# Altium PCB 24V-7A-Power-Board-v2.0.PcbDoc (part 4 of 5)
Units mil, origin at the board's own origin, x right, y up, seen from the top; angles counter-clockwise.
Board outline 4921.26 x 6102.36 mil, 2 copper layers (Top Layer, Bottom Layer); 158 components, 79 nets, 394 pads, 81 vias.
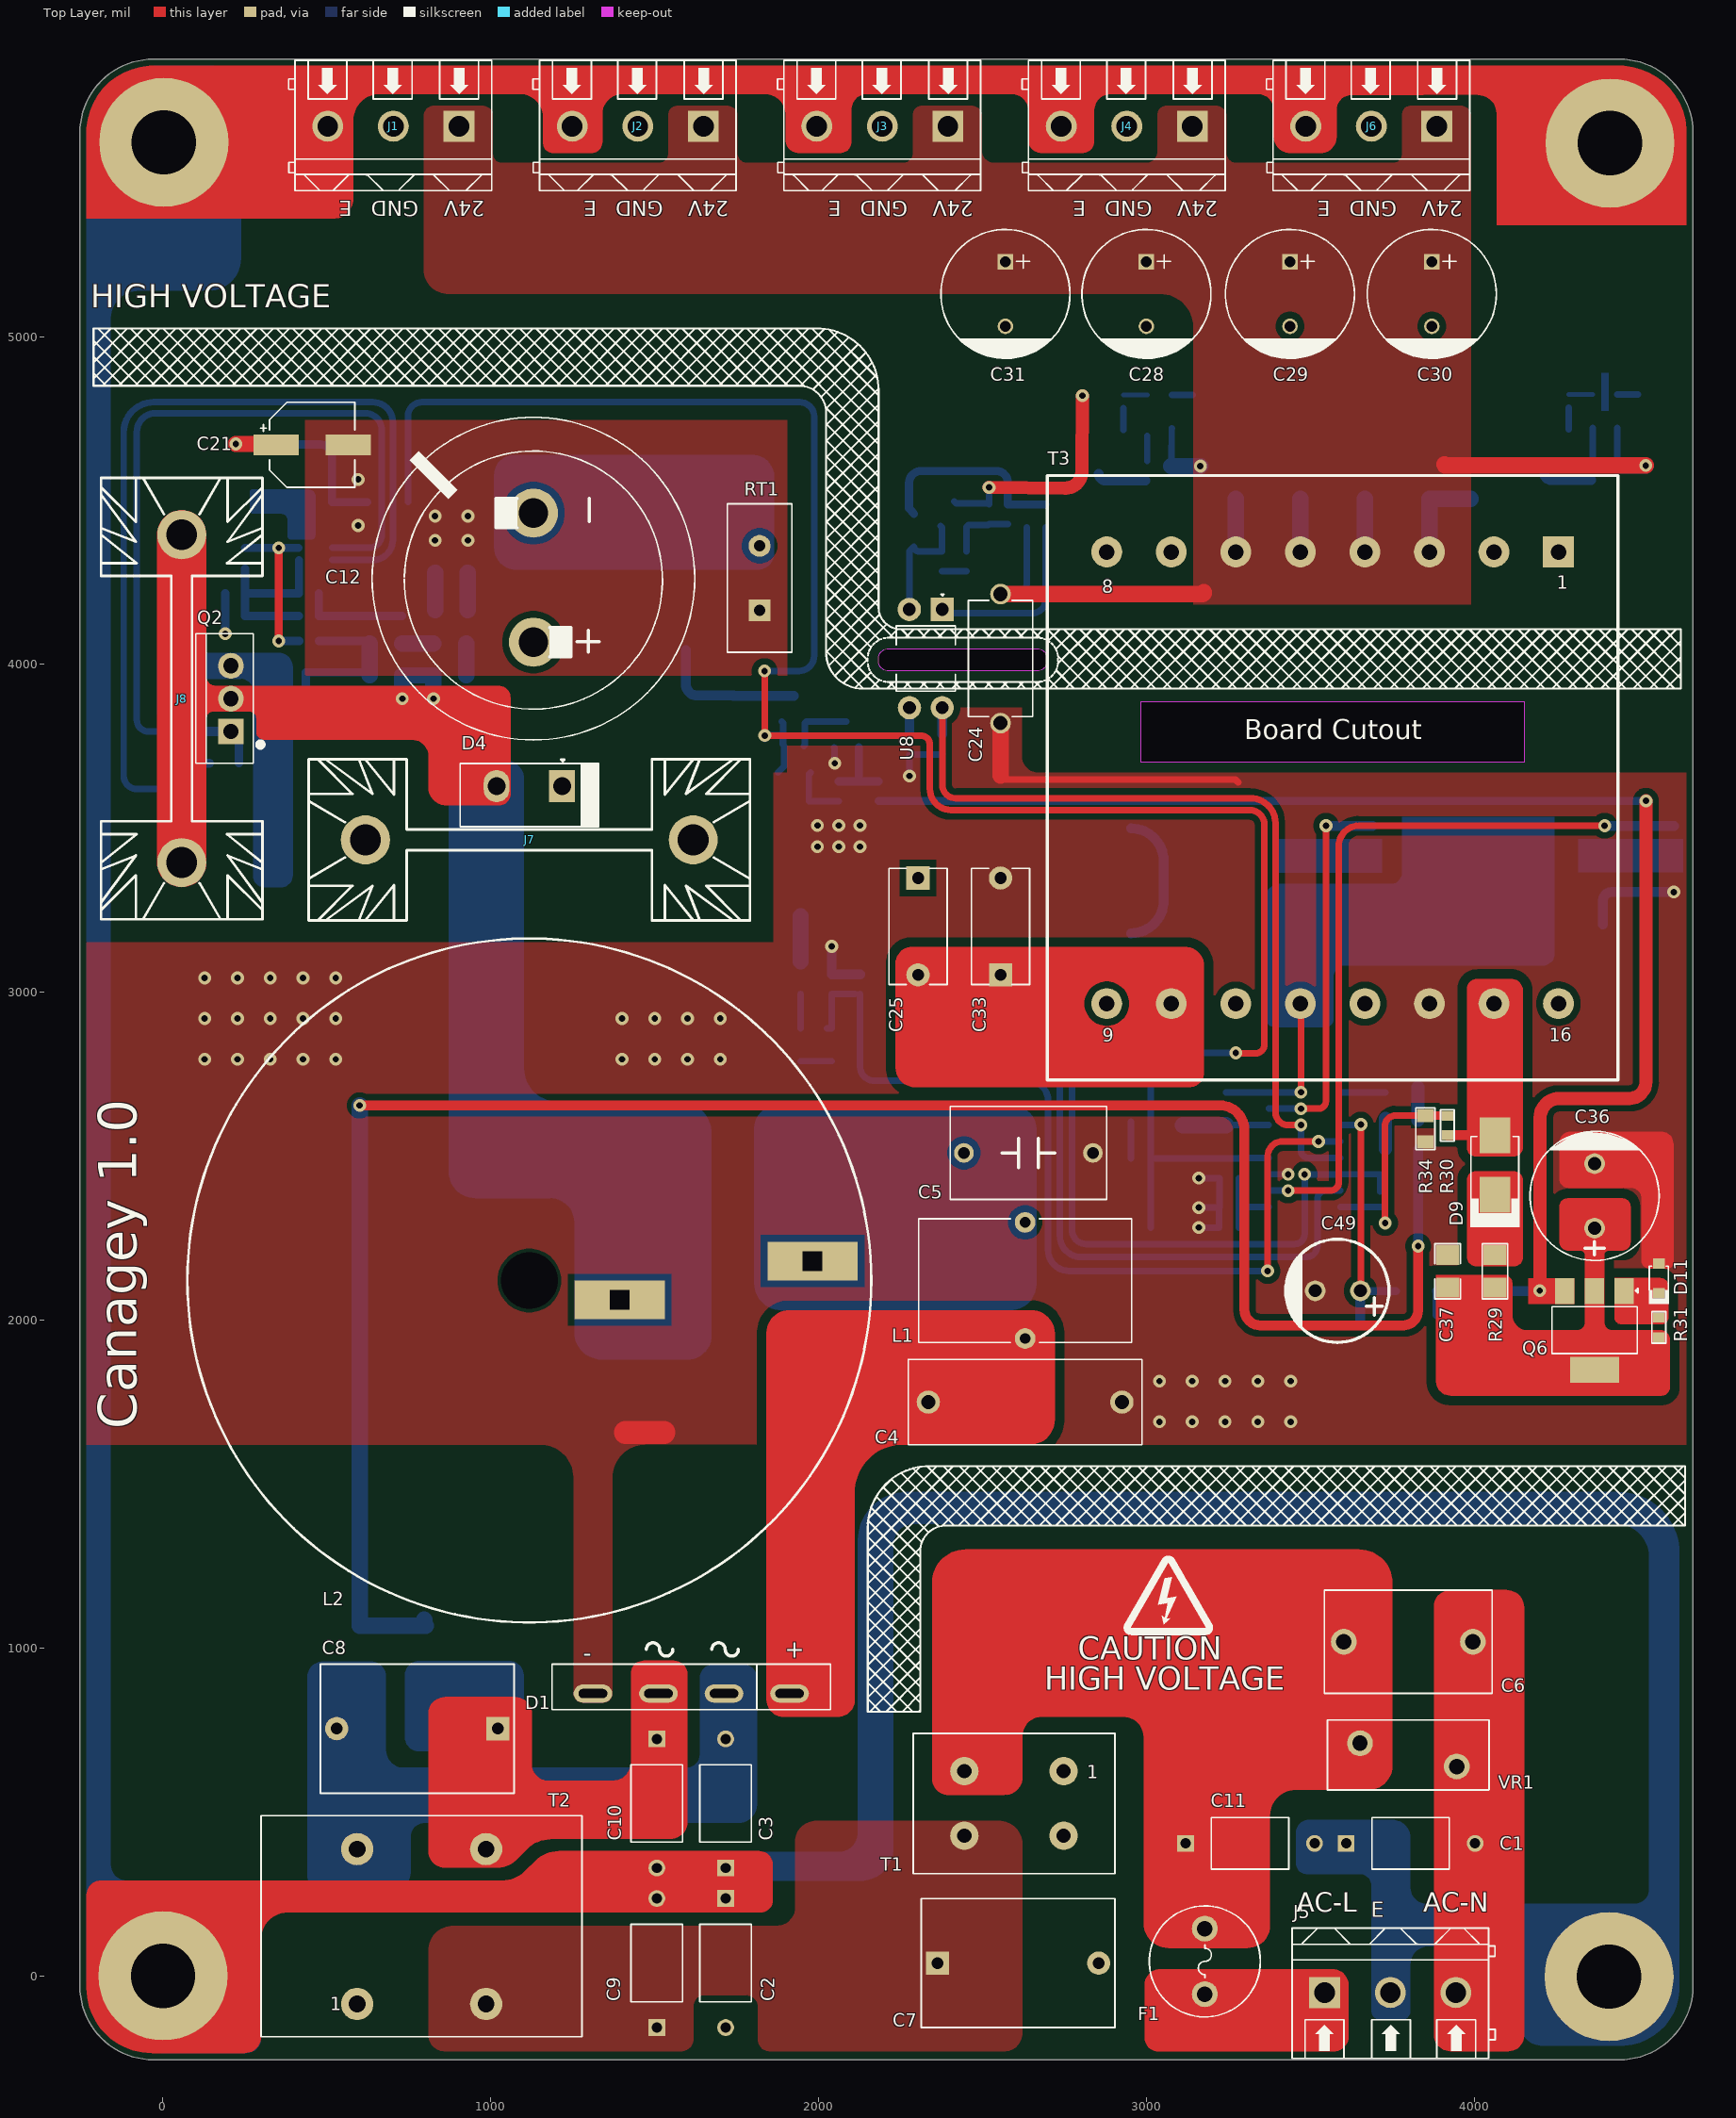
[diagram p0: Top Layer view]

## Part data (continued)
R49: library part CRCW060337K4FKEA, "RES SMD 37.4K OHM 1% 1/10W 0603", LCSC Part Number=C844359, Manufacturer=Vishay, ComponentLink1Description=https://datasheet.ciiva.com/5541/dcrcwe3-109170-5541061.pdf?src-supplier=Mouser, ComponentLink1URL=https://datasheet.ciiva.com/5541/dcrcwe3-109170-5541061.pdf?src-supplier=Mouser, ComponentLink2Description=https://datasheet.ciiva.com/22705/1697337-22705851.pdf?src-supplier=Element14, ComponentLink2URL=https://datasheet.ciiva.com/22705/1697337-22705851.pdf?src-supplier=Element14, ComponentLink3Description=https://datasheet.ciiva.com/16770/70201119-16770680.pdf?src-supplier=Allied+Electronics, ComponentLink3URL=https://datasheet.ciiva.com/16770/70201119-16770680.pdf?src-supplier=Allied+Electronics, ComponentLink4Description=https://datasheet.ciiva.com/7671/1697337-7671645.pdf?src-supplier=Element14, ComponentLink4URL=https://datasheet.ciiva.com/7671/1697337-7671645.pdf?src-supplier=Element14, ComponentLink5Description=https://datasheet.ciiva.com/7671/1697337-7671646.pdf?src-supplier=Element14, ComponentLink5URL=https://datasheet.ciiva.com/7671/1697337-7671646.pdf?src-supplier=Element14, ComponentLink6Description=https://datasheet.ciiva.com/3257/dcrcwe3-3257503.pdf?src-supplier=Avnet, ComponentLink6URL=https://datasheet.ciiva.com/3257/dcrcwe3-3257503.pdf?src-supplier=Avnet, ComponentLink7Description=https://datasheet.ciiva.com/7792/125364-7792237.pdf?src-supplier=Element14, ComponentLink7URL=https://datasheet.ciiva.com/7792/125364-7792237.pdf?src-supplier=Element14, ComponentLink8Description=https://datasheet.ciiva.com/16203/dcrcwe3-16203015.pdf?src-supplier=Future+Electronics, ComponentLink8URL=https://datasheet.ciiva.com/16203/dcrcwe3-16203015.pdf?src-supplier=Future+Electronics, ComponentLink9Description=https://datasheet.ciiva.com/2465/dcrcwe3-2465762.pdf?src-supplier=Digikey, ComponentLink9URL=https://datasheet.ciiva.com/2465/dcrcwe3-2465762.pdf?src-supplier=Digikey, ComponentLink10Description=https://datasheet.ciiva.com/2465/dcrcwe3-2465763.pdf?src-supplier=Digikey, ComponentLink10URL=https://datasheet.ciiva.com/2465/dcrcwe3-2465763.pdf?src-supplier=Digikey, ComponentLink11Description=https://datasheet.ciiva.com/2465/dcrcwe3-2465764.pdf?src-supplier=Digikey, ComponentLink11URL=https://datasheet.ciiva.com/2465/dcrcwe3-2465764.pdf?src-supplier=Digikey, ComponentLink12Description=https://datasheet.ciiva.com/8337/dcrcwe3-8337085.pdf?src-supplier=Avnet, ComponentLink12URL=https://datasheet.ciiva.com/8337/dcrcwe3-8337085.pdf?src-supplier=Avnet, Item Type=Resistor, Manufacturer Part Number=CRCW060337K4FKEA, Pricing="1=0.1, 10=0.026, 50=0.0166, 100=0.014, 500=0.00954, 1000=0.00824 (USD)", RoHS=Yes, Stock=9664, Supplier=Digikey
R50: library part CRCW060344K2FKEA, "RES SMD 44.2K OHM 1% 1/10W 0603", LCSC Part Number=C844365, Manufacturer=Vishay, Voltage Rating (DC)=75V, ComponentLink1Description=https://datasheet.ciiva.com/11812/0900766b80d98afc-11812612.pdf?src-supplier=Rs, ComponentLink1URL=https://datasheet.ciiva.com/11812/0900766b80d98afc-11812612.pdf?src-supplier=Rs, ComponentLink2Description=https://datasheet.ciiva.com/2466/dcrcwe3-2466281.pdf?src-supplier=Digikey, ComponentLink2URL=https://datasheet.ciiva.com/2466/dcrcwe3-2466281.pdf?src-supplier=Digikey, ComponentLink3Description=https://datasheet.ciiva.com/2466/dcrcwe3-2466282.pdf?src-supplier=Digikey, ComponentLink3URL=https://datasheet.ciiva.com/2466/dcrcwe3-2466282.pdf?src-supplier=Digikey, ComponentLink4Description=https://datasheet.ciiva.com/2466/dcrcwe3-2466283.pdf?src-supplier=Digikey, ComponentLink4URL=https://datasheet.ciiva.com/2466/dcrcwe3-2466283.pdf?src-supplier=Digikey, ComponentLink5Description=https://datasheet.ciiva.com/15159/getdatasheetpartid-52050-15159597.pdf?src-supplier=Verical, ComponentLink5URL=https://datasheet.ciiva.com/15159/getdatasheetpartid-52050-15159597.pdf?src-supplier=Verical, ComponentLink6Description=https://datasheet.ciiva.com/16507/dcrcwe3-16507773.pdf?src-supplier=Future+Electronics, ComponentLink6URL=https://datasheet.ciiva.com/16507/dcrcwe3-16507773.pdf?src-supplier=Future+Electronics, ComponentLink7Description=https://datasheet.ciiva.com/22705/1697337-22705852.pdf?src-supplier=Element14, ComponentLink7URL=https://datasheet.ciiva.com/22705/1697337-22705852.pdf?src-supplier=Element14, ComponentLink8Description=https://datasheet.ciiva.com/7671/1697337-7671657.pdf?src-supplier=Element14, ComponentLink8URL=https://datasheet.ciiva.com/7671/1697337-7671657.pdf?src-supplier=Element14, ComponentLink9Description=https://datasheet.ciiva.com/7671/1697337-7671658.pdf?src-supplier=Element14, ComponentLink9URL=https://datasheet.ciiva.com/7671/1697337-7671658.pdf?src-supplier=Element14, ComponentLink10Description=https://datasheet.ciiva.com/16772/70201119-16772373.pdf?src-supplier=Allied+Electronics, ComponentLink10URL=https://datasheet.ciiva.com/16772/70201119-16772373.pdf?src-supplier=Allied+Electronics, ComponentLink11Description=https://datasheet.ciiva.com/22872/70201119-22872024.pdf?src-supplier=Allied+Electronics, ComponentLink11URL=https://datasheet.ciiva.com/22872/70201119-22872024.pdf?src-supplier=Allied+Electronics, Item Type=Resistor, Lead Free=5697LeadFree, Manufacturer Part Number=CRCW060344K2FKEA, Pricing="1=0.1, 10=0.026, 50=0.0166, 100=0.014, 500=0.00954, 1000=0.00824 (USD)", RoHS=Yes, Stock=24979, Supplier=Digikey
R51: library part RC0603JR-070RL, "RES 0 OHM JUMPER 1/10W 0603", Case Code (Imperial)=0603, Case Code (Metric)=1608, LCSC Part Number=C95177, Manufacturer=Yageo, Max Operating Temperature=155°C, Max Power Dissipation=100mW, Min Operating Temperature=-55°C, Package Quantity=5000, Resistance=0mR, Resistance Tolerance=5%, Resistor Type="Thick Film", Supplier Part Number 1=311-0.0GRCT-ND, Temperature Coefficient=200ppm/°C, Tolerance=1%, Voltage Rating=50V, Case/Package=0603, Category="Chip SMD Resistors", Construction=Rectangular, Contact Plating=Tin,Matte, Depth=0.8mm, Features="Moisture Resistant", Height=0.45mm, Item Type=Resistor, Lead Free="Lead Free", Length=1.6mm, Manufacturer Part Number=RC0603JR-070RL, Military Standard=Not, Number of Pins=2, Number of Terminations=2, Packaging="Tape and Reel", Power Rating=100mW, Pricing 1="1=0.10000, 10=0.01700, 25=0.01240, 50=0.00960, 100=0.00700, 250=0.00536, 500=0.00430, 1000=0.00316 (USD)", Radiation Hardening=No, Reach SVHC Compliant="No SVHC", RoHS=Yes, RoHS Compliant=Yes, Series=RC, Size Code=0603, Stock 1=18081776, Supplier 1=Digi-Key, Technology="THICK FILM", Termination=SMD/SMT, Voltage Rating (DC)=50V, Width=0.8mm
R52 R53: library part AC0603FR-07324KL, "RES SMD 324K OHM 1% 1/10W 0603", Case Code (Imperial)=0603, Case Code (Metric)=1608, LCSC Part Number=C227818, Manufacturer=Yageo, Max Operating Temperature=155°C, Max Power Dissipation=100mW, Min Operating Temperature=-55°C, Package Quantity=1, Temperature Coefficient=100ppm/°C, Tolerance=1%, Voltage Rating=50V, Case/Package=0603, ComponentLink1Description=http://www.mouser.com/ds/2/447/yageodocoutput-1111992.pdf?src-supplier=Mouser, ComponentLink1URL=http://www.mouser.com/ds/2/447/yageodocoutput-1111992.pdf?src-supplier=Mouser, ComponentLink2Description=https://www.yageo.com/upload/media/product/productsearch/datasheet/rchip/PYu-AC_51_RoHS_L_7.pdf?src-supplier=Digikey, ComponentLink2URL=https://www.yageo.com/upload/media/product/productsearch/datasheet/rchip/PYu-AC_51_RoHS_L_7.pdf?src-supplier=Digikey, Features="Moisture Resistant,Automotive AEC-Q200,Anti-Sulfur", Height=0.022inch, Item Type=Resistors, Length=0.063inch, Manufacturer Part Number=AC0603FR-07324KL, Number of Terminations=2, Packaging="Tape and Reel", Power Rating=100mW, Pricing="1=0.1, 10=0.021, 50=0.013, 100=0.0108, 500=0.00734, 1000=0.00633 (USD)", RoHS=Yes, RoHS Compliant=Yes, Series=AC, Stock=5000, Supplier=Digikey, Termination=SMD/SMT, Width=0.031inch
R54: library part CRCW060320R0FKEA, "RES SMD 20 OHM 1% 1/10W 0603", Case Code (Imperial)=0603, Case Code (Metric)=1608, LCSC Part Number=C844755, Manufacturer=Vishay, Max Operating Temperature=155°C, Max Power Dissipation=100mW, Min Operating Temperature=-55°C, Package Quantity=10, Ratings=AEC-Q200, Resistance Tolerance=1%, Resistor Type="Thick Film", Temperature Coefficient=100ppm/°C, Voltage Rating=75V, Case/Package=0603, ComponentLink1Description=https://datasheet.ciiva.com/11810/0900766b80d98afc-11810778.pdf?src-supplier=Rs, ComponentLink1URL=https://datasheet.ciiva.com/11810/0900766b80d98afc-11810778.pdf?src-supplier=Rs, ComponentLink2Description=https://datasheet.ciiva.com/7748/1533075-7748858.pdf?src-supplier=Element14, ComponentLink2URL=https://datasheet.ciiva.com/7748/1533075-7748858.pdf?src-supplier=Element14, ComponentLink3Description=https://datasheet.ciiva.com/2465/dcrcwe3-2465673.pdf?src-supplier=Digikey, ComponentLink3URL=https://datasheet.ciiva.com/2465/dcrcwe3-2465673.pdf?src-supplier=Digikey, ComponentLink4Description=https://datasheet.ciiva.com/2465/dcrcwe3-2465674.pdf?src-supplier=Digikey, ComponentLink4URL=https://datasheet.ciiva.com/2465/dcrcwe3-2465674.pdf?src-supplier=Digikey, ComponentLink5Description=https://datasheet.ciiva.com/16776/70201119-16776202.pdf?src-supplier=Allied+Electronics, ComponentLink5URL=https://datasheet.ciiva.com/16776/70201119-16776202.pdf?src-supplier=Allied+Electronics, ComponentLink6Description=https://datasheet.ciiva.com/26316/fld-crcw-e3-data-en-26316589.pdf?src-supplier=Distrelec, ComponentLink6URL=https://datasheet.ciiva.com/26316/fld-crcw-e3-data-en-26316589.pdf?src-supplier=Distrelec, ComponentLink7Description=https://datasheet.ciiva.com/2465/dcrcwe3-2465672.pdf?src-supplier=Digikey, ComponentLink7URL=https://datasheet.ciiva.com/2465/dcrcwe3-2465672.pdf?src-supplier=Digikey, ComponentLink8Description=https://datasheet.ciiva.com/16788/70201119-16788011.pdf?src-supplier=Allied+Electronics, ComponentLink8URL=https://datasheet.ciiva.com/16788/70201119-16788011.pdf?src-supplier=Allied+Electronics, ComponentLink9Description=https://datasheet.ciiva.com/5548/dcrcwe3-109170-5548022.pdf?src-supplier=Mouser, ComponentLink9URL=https://datasheet.ciiva.com/5548/dcrcwe3-109170-5548022.pdf?src-supplier=Mouser, ComponentLink10Description=https://datasheet.ciiva.com/3257/dcrcwe3-3257244.pdf?src-supplier=Avnet, ComponentLink10URL=https://datasheet.ciiva.com/3257/dcrcwe3-3257244.pdf?src-supplier=Avnet, ComponentLink11Description=https://datasheet.ciiva.com/16374/dcrcwe3-16374634.pdf?src-supplier=Future+Electronics, ComponentLink11URL=https://datasheet.ciiva.com/16374/dcrcwe3-16374634.pdf?src-supplier=Future+Electronics, ComponentLink12Description=https://datasheet.ciiva.com/3257/dcrcwe3-3257243.pdf?src-supplier=Avnet, ComponentLink12URL=https://datasheet.ciiva.com/3257/dcrcwe3-3257243.pdf?src-supplier=Avnet, Construction=Rectangular, Contact Plating=Tin, Depth=0.85mm, Features="Automotive AEC-Q200", Height=0.45mm, Item Type=Resistors, Lead Free="Lead Free", Length=1.55mm, Manufacturer Part Number=CRCW060320R0FKEA, Military Standard=Not, Number of Terminations=2, Packaging="Tape and Reel", Power Rating=100mW, Pricing="1=0.1, 10=0.026, 50=0.0166, 100=0.014, 500=0.00954, 1000=0.00824 (USD)", Radiation Hardening=No, Reach SVHC Compliant=Unknown, RoHS=Yes, RoHS Compliant=Yes, Series=CRCW, Stock=100733, Supplier=Digikey, Technology="THICK FILM", Termination=SMD/SMT, Tolerance=1%, Voltage Rating (DC)=75V, Weight=7.1E-05oz, Width=0.033inch
R55: library part RC1206FR-0720KL, "RES 20K OHM 1% 1/4W 1206", LCSC Part Number=C114940, Manufacturer=Yageo, Voltage Rating (DC)=200V, ComponentLink1Description=https://datasheet.ciiva.com/11809/0900766b80c6630a-11809460.pdf?src-supplier=Rs, ComponentLink1URL=https://datasheet.ciiva.com/11809/0900766b80c6630a-11809460.pdf?src-supplier=Rs, ComponentLink2Description=https://datasheet.ciiva.com/16746/pyu-rc1206-51-rohs-l-4-16746334.pdf?src-supplier=Future+Electronics, ComponentLink2URL=https://datasheet.ciiva.com/16746/pyu-rc1206-51-rohs-l-4-16746334.pdf?src-supplier=Future+Electronics, Item Type=Resistors, Lead Free=5697LeadFree, Manufacturer Part Number=RC1206FR-0720KL, Pricing="1=0.1, 10=0.038, 50=0.0244, 100=0.0206, 500=0.01434, 1000=0.01248 (USD)", RoHS=Yes, Stock=286094, Supplier=Digikey
R56: library part CRCW060312K4FKEA, "RES SMD 12.4K OHM 1% 1/10W 0603", Case Code (Imperial)=0603, Case Code (Metric)=1608, Case/Package=345Case, LCSC Part Number=C844524, Manufacturer=Vishay, Max Operating Temperature=155°C, Min Operating Temperature=-55°C, Power Rating=100mW, Resistance Tolerance=1%, Resistor Type="Thick Film", Temperature Coefficient=100ppm/°C, Voltage Rating=75V, ComponentLink1Description=http://www.farnell.com/datasheets/2310790.pdf?src-supplier=Farnell, ComponentLink1URL=http://www.farnell.com/datasheets/2310790.pdf?src-supplier=Farnell, ComponentLink2Description=https://datasheet.octopart.com/CRCW060312K4FKEA-Vishay-datasheet-62317933.pdf?src-supplier=Element14, ComponentLink2URL=https://datasheet.octopart.com/CRCW060312K4FKEA-Vishay-datasheet-62317933.pdf?src-supplier=Element14, ComponentLink3Description=http://www.farnell.com/datasheets/2310790.pdf?src-supplier=Newark, ComponentLink3URL=http://www.farnell.com/datasheets/2310790.pdf?src-supplier=Newark, ComponentLink4Description=https://datasheet.octopart.com/CRCW060312K4FKEA-Vishay-datasheet-5300368.pdf?src-supplier=Future+Electronics, ComponentLink4URL=https://datasheet.octopart.com/CRCW060312K4FKEA-Vishay-datasheet-5300368.pdf?src-supplier=Future+Electronics, ComponentLink5Description=http://www.farnell.com/datasheets/2310790.pdf?src-supplier=Element14, ComponentLink5URL=http://www.farnell.com/datasheets/2310790.pdf?src-supplier=Element14, ComponentLink6Description=https://datasheet.octopart.com/CRCW060312K4FKEA-Vishay-datasheet-83961561.pdf?src-supplier=Newark, ComponentLink6URL=https://datasheet.octopart.com/CRCW060312K4FKEA-Vishay-datasheet-83961561.pdf?src-supplier=Newark, Height=500um, Item Type=Resistors, Lead Free=5697LeadFree, Manufacturer Part Number=CRCW060312K4FKEA, Packaging=13Packaging, Pins=2NUMBER, Pricing="1=0.1, 10=0.026, 50=0.0166, 100=0.014, 500=0.00954, 1000=0.00824 (USD)", RoHS=Yes, RoHS Compliant=Yes, Stock=12301, Supplier=Digikey, Tolerance=1%
RT1: "ICL 10 OHM 20% 3.5A 11.5MM", Current Rating=3.5A, LCSC Part Number=C125458, Manufacturer="TDK EPCOS", Tolerance=20%, ComponentLink1Description=https://datasheet.ciiva.com/15097/getdatasheetpartid-119550-15097692.pdf?src-supplier=Verical, ComponentLink1URL=https://datasheet.ciiva.com/15097/getdatasheetpartid-119550-15097692.pdf?src-supplier=Verical, ComponentLink2Description=https://datasheet.ciiva.com/1321/1851770-1321676.pdf?src-supplier=Element14, ComponentLink2URL=https://datasheet.ciiva.com/1321/1851770-1321676.pdf?src-supplier=Element14, Diameter=11.5mm, Item Type=Thermistors, Lead Free=5697LeadFree, Manufacturer Part Number=B57236S0100M000, Pricing="1=0.84, 10=0.78, 50=0.646, 100=0.572, 1000=0.44, 10000=0.373 (USD)", RoHS=Yes, Stock=2235, Supplier=Mouser, Thickness=6mm
T1: "CMC 1MH 3A 2LN TH", Manufacturer="Wurth Electronics", Supplier Part Number=732-1439-ND, ComponentLink1Description=https://datasheet.ciiva.com/4952/744822301-91864-4952415.pdf?src-supplier=Mouser, ComponentLink1URL=https://datasheet.ciiva.com/4952/744822301-91864-4952415.pdf?src-supplier=Mouser, ComponentLink2Description=https://datasheet.ciiva.com/11796/0900766b804ac271-11796688.pdf?src-supplier=Rs, ComponentLink2URL=https://datasheet.ciiva.com/11796/0900766b804ac271-11796688.pdf?src-supplier=Rs, ComponentLink3Description=https://datasheet.ciiva.com/7211/70388-7211253.pdf?src-supplier=Newark, ComponentLink3URL=https://datasheet.ciiva.com/7211/70388-7211253.pdf?src-supplier=Newark, ComponentLink4Description=https://datasheet.ciiva.com/7754/1736520-7754735.pdf?src-supplier=Element14, ComponentLink4URL=https://datasheet.ciiva.com/7754/1736520-7754735.pdf?src-supplier=Element14, ComponentLink5Description=https://datasheet.ciiva.com/6216/744822301-6216281.pdf?src-supplier=Digikey, ComponentLink5URL=https://datasheet.ciiva.com/6216/744822301-6216281.pdf?src-supplier=Digikey, Item Type=Inductor, Manufacturer Part Number=744822301, Pricing="1=4.57, 10=4.5, 50=3.57, 140=3.41, 280=3.1 (USD)", RoHS=Yes, Stock=1589, Supplier=Digikey
T2: "CMC 10MH 3A 2LN TH", Case/Package=L, Current=3A, DC Resistance (DCR)=105mR, Inductance Tolerance=30%, Manufacturer="Wurth Electronics", Max Operating Temperature=125°C, Min Operating Temperature=-40°C, Package Quantity=200, Supplier Part Number=732-1452-ND, Test Frequency=10kHz, ComponentLink1Description=https://datasheet.ciiva.com/11796/0900766b804acf58-11796710.pdf?src-supplier=Rs, ComponentLink1URL=https://datasheet.ciiva.com/11796/0900766b804acf58-11796710.pdf?src-supplier=Rs, ComponentLink2Description=https://datasheet.ciiva.com/4952/744824310-39306-4952431.pdf?src-supplier=Mouser, ComponentLink2URL=https://datasheet.ciiva.com/4952/744824310-39306-4952431.pdf?src-supplier=Mouser, ComponentLink3Description=https://datasheet.ciiva.com/6214/744824310-6214810.pdf?src-supplier=Digikey, ComponentLink3URL=https://datasheet.ciiva.com/6214/744824310-6214810.pdf?src-supplier=Digikey, ComponentLink4Description=https://datasheet.ciiva.com/7211/70411-7211262.pdf?src-supplier=Newark, ComponentLink4URL=https://datasheet.ciiva.com/7211/70411-7211262.pdf?src-supplier=Newark, ComponentLink5Description=https://datasheet.ciiva.com/7754/1736534-7754741.pdf?src-supplier=Element14, ComponentLink5URL=https://datasheet.ciiva.com/7754/1736534-7754741.pdf?src-supplier=Element14, ComponentLink6Description=https://datasheet.ciiva.com/48690/001088035-da-01-ml-we-cmb-stromkomp-netzdrossel-74482-de-en-48690603.pdf?src-supplier=Conrad, ComponentLink6URL=https://datasheet.ciiva.com/48690/001088035-da-01-ml-we-cmb-stromkomp-netzdrossel-74482-de-en-48690603.pdf?src-supplier=Conrad, Current Rating=3A, Depth=18.5mm, Height=33mm, Item Type="Common Mode Chokes", Lead Free="Lead Free", Lead Pitch=10mm, Length=27.5mm, Manufacturer Part Number=744824310, Max DC Current=3A, Mounting Technology="Through Hole,Radial", Number of Lines=2, Packaging=Bulk, Pins=4, Pricing="1=5.63, 10=5.54, 100=4.39, 250=4.2, 500=3.82 (USD)", Reach SVHC Compliant=No, RoHS=Yes, RoHS Compliant=Yes, Series=WE-CMB, Stock=278, Supplier=Digikey, Termination=Radial, Tolerance=30%, Width=18.5mm
T3: "XFMR RES CONV AC/DC 400UH TH", Current Rating=10.4A, Frequency=120kHz, Manufacturer="Wurth Electronics", Max Operating Temperature=125°C, Min Operating Temperature=-40°C, Output Voltage=24V, Package Quantity=20, Power Rating=250W, Supplier Part Number=732-5069-ND, ComponentLink1Description=https://datasheet.ciiva.com/24142/760895741-270531-24142074.pdf?src-supplier=Mouser, ComponentLink1URL=https://datasheet.ciiva.com/24142/760895741-270531-24142074.pdf?src-supplier=Mouser, ComponentLink2Description=https://datasheet.ciiva.com/29632/760895741-29632482.pdf?src-supplier=Digikey, ComponentLink2URL=https://datasheet.ciiva.com/29632/760895741-29632482.pdf?src-supplier=Digikey, Height=27.5mm, Item Type=Transformer, Length=48mm, Manufacturer Part Number=760895741, Mounting Technology="Through Hole", Output Current=10.4A, Packaging=Tray, Pricing="1=22.74, 10=21.792, 50=20.43, 100=18.3881, 500=15.66304 (USD)", RoHS=Yes, RoHS Compliant=Yes, Series=WE-LLCR, Shielding=Unshielded, Stock=7, Supplier=Digikey, Termination=Solder, Width=35mm
U1: "IC PFC CTRLR TRANSITION SOT23-6", LCSC Part Number=C2868631, Manufacturer="Texas Instruments", Package=SOT-23-6, ComponentLink1Description=LCSC, ComponentLink1URL=https://www.lcsc.com/product-detail/AC-DC-Controllers-Regulators_Texas-Instruments-UCC28056DBVT_C2868631.html, Item Type=IC, Manufacturer Part Number=UCC28056DBVT
U2 U3: "MOSFET N-CH 650V 22.4A D2PAK", Case/Package=TO-263-3, LCSC Part Number=C536639, Manufacturer=Infineon, Halogen Free="Halogen Free", Item Type=Mosfet, Manufacturer Part Number=IPB65R150CFDA, Packaging="Tape and Reel", Pins=3, Pricing="1000=2.73 (USD)", Stock=1000, Supplier="Future Electronics"
U4 U5: "SYNC RECTIFIER FLYBACK", LCSC Part Number=C471044, Manufacturer="Texas Instruments", ComponentLink1Description=http://www.ti.com/general/docs/suppproductinfo.tsp?distId=10&amp;gotoUrl=http%3A%2F%2Fwww.ti.com%2Flit%2Fgpn%2Fucc24612&src-supplier=Digikey, ComponentLink1URL=http://www.ti.com/general/docs/suppproductinfo.tsp?distId=10&amp;gotoUrl=http%3A%2F%2Fwww.ti.com%2Flit%2Fgpn%2Fucc24612&src-supplier=Digikey, Height=1.45mm, Item Type=IC, Length=2.9mm, Manufacturer Part Number=UCC24612-2DBVR, Pins=5NUMBER, Pricing="1=0.92, 10=0.758, 50=0.758, 100=0.575, 1000=0.392, 10000=0.317 (USD)", RoHS=Yes, Stock=6284, Supplier=Mouser, Thickness=1.2mm, Width=1.6mm
U6: "HALF BRIDGE CONT WITH HV DRIVER", LCSC Part Number=C2867939, Manufacturer="Texas Instruments", ComponentLink1Description=http://www.ti.com/general/docs/suppproductinfo.tsp?distId=10&amp;gotoUrl=http%3A%2F%2Fwww.ti.com%2Flit%2Fgpn%2Fucc256402&src-supplier=Digikey, ComponentLink1URL=http://www.ti.com/general/docs/suppproductinfo.tsp?distId=10&amp;gotoUrl=http%3A%2F%2Fwww.ti.com%2Flit%2Fgpn%2Fucc256402&src-supplier=Digikey, Item Type=IC, Manufacturer Part Number=UCC256404DDBR, Pricing="1=2.34, 10=1.99, 50=1.99, 100=1.69, 1000=1.15, 10000=0.981 (USD)", RoHS=Yes, Stock=2756, Supplier=Mouser
U7: "IC VREF SHUNT ADJ 1% SOT23-3", LCSC Part Number=C1852128, Manufacturer="Texas Instruments", ComponentLink1Description=http://www.ti.com/general/docs/suppproductinfo.tsp?distId=10&amp;gotoUrl=http%3A%2F%2Fwww.ti.com%2Flit%2Fgpn%2Fatl431li-q1&src-supplier=Digikey, ComponentLink1URL=http://www.ti.com/general/docs/suppproductinfo.tsp?distId=10&amp;gotoUrl=http%3A%2F%2Fwww.ti.com%2Flit%2Fgpn%2Fatl431li-q1&src-supplier=Digikey, Item Type=IC, Manufacturer Part Number=ATL432LIAQDBZRQ1, Pricing="1=0.61, 10=0.523, 25=0.488, 100=0.3903, 250=0.3624, 500=0.30664, 1000=0.23695 (USD)", RoHS=Yes, Stock=1265, Supplier=Digikey
U8: "Optocoupler DC-IN 1-CH Transistor DC-OUT 4-Pin PDIP", LCSC Part Number=C142630, Manufacturer="Vishay Semiconductors", ComponentLink1Description=https://datasheet.ciiva.com/26941/getdatasheetpartid-641306-26941970.pdf?src-supplier=Verical, ComponentLink1URL=https://datasheet.ciiva.com/26941/getdatasheetpartid-641306-26941970.pdf?src-supplier=Verical, ComponentLink2Description=https://datasheet.ciiva.com/2087/vo618a-2087569.pdf?src-supplier=Digikey, ComponentLink2URL=https://datasheet.ciiva.com/2087/vo618a-2087569.pdf?src-supplier=Digikey, ComponentLink3Description=https://datasheet.ciiva.com/8086/vo618a-8086102.pdf?src-supplier=Avnet, ComponentLink3URL=https://datasheet.ciiva.com/8086/vo618a-8086102.pdf?src-supplier=Avnet, Item Type=Optocouplers, Manufacturer Part Number=VO618A-3, Pricing="1=0.46, 10=0.283, 100=0.1626, 1000=0.12726, 2000=0.11666, 5000=0.10605, 10000=0.09898, 25000=0.09544 (USD)", RoHS=Yes, Stock=6419, Supplier=Digikey
VR1: "VARISTOR 430V 3.5KA DISC 10MM", Case/Package=Radial, Clamping Current=25A, Clamping Voltage=710V, Flammability Rating=5813Flammability, LCSC Part Number=C210564, Manufacturer="TDK EPCOS", Max Operating Temperature=85°C, Max Surge Current=3.5kA, Max Varistor Voltage=473V, Max Voltage Rating (AC)=275V, Max Voltage Rating (DC)=350V, Min Operating Temperature=-40°C, Min Varistor Voltage=387V, Power Rating=400mW, Tolerance=10%, Varistor Voltage=430V, ComponentLink1Description=http://www.farnell.com/datasheets/1680955.pdf?src-supplier=Farnell, ComponentLink1URL=http://www.farnell.com/datasheets/1680955.pdf?src-supplier=Farnell, ComponentLink2Description=http://www.farnell.com/datasheets/2311597.pdf?src-supplier=Farnell, ComponentLink2URL=http://www.farnell.com/datasheets/2311597.pdf?src-supplier=Farnell, ComponentLink3Description=http://components.arrow.com/part/dataview/30869957S9461734N9769?src-supplier=Arrow+Electronics, ComponentLink3URL=http://components.arrow.com/part/dataview/30869957S9461734N9769?src-supplier=Arrow+Electronics, ComponentLink4Description=http://www.farnell.com/datasheets/1680955.pdf?src-supplier=Element14, ComponentLink4URL=http://www.farnell.com/datasheets/1680955.pdf?src-supplier=Element14, ComponentLink5Description=http://www.farnell.com/datasheets/2311597.pdf?src-supplier=Newark, ComponentLink5URL=http://www.farnell.com/datasheets/2311597.pdf?src-supplier=Newark, ComponentLink6Description=http://datasheet.octopart.com/B72210S2271K101-EPCOS-datasheet-11546246.pdf?src-supplier=Distrelec, ComponentLink6URL=http://datasheet.octopart.com/B72210S2271K101-EPCOS-datasheet-11546246.pdf?src-supplier=Distrelec, ComponentLink7Description=https://en.tdk.eu/inf/70/db/var/SIOV_Leaded_AdvanceD.pdf?src-supplier=Digikey, ComponentLink7URL=https://en.tdk.eu/inf/70/db/var/SIOV_Leaded_AdvanceD.pdf?src-supplier=Digikey, ComponentLink8Description=https://datasheet.octopart.com/S10K275E2-EPCOS-datasheet-5104.pdf?src-supplier=Future+Electronics, ComponentLink8URL=https://datasheet.octopart.com/S10K275E2-EPCOS-datasheet-5104.pdf?src-supplier=Future+Electronics, ComponentLink9Description=http://datasheet.octopart.com/B72210S2271K101-EPCOS-datasheet-11546246.pdf?src-supplier=Mouser, ComponentLink9URL=http://datasheet.octopart.com/B72210S2271K101-EPCOS-datasheet-11546246.pdf?src-supplier=Mouser, ComponentLink10Description=https://datasheet.octopart.com/B72210S2271K101-EPCOS-datasheet-11546246.pdf?src-supplier=Newark, ComponentLink10URL=https://datasheet.octopart.com/B72210S2271K101-EPCOS-datasheet-11546246.pdf?src-supplier=Newark, ComponentLink11Description=http://datasheet.octopart.com/B72210S2271K101-EPCOS-datasheet-11546246.pdf?src-supplier=Avnet, ComponentLink11URL=http://datasheet.octopart.com/B72210S2271K101-EPCOS-datasheet-11546246.pdf?src-supplier=Avnet, ComponentLink12Description=http://www.epcos.com/inf/70/db/var_08/SIOV_Leaded_StandarD.pdf?src-supplier=Future+Electronics, ComponentLink12URL=http://www.epcos.com/inf/70/db/var_08/SIOV_Leaded_StandarD.pdf?src-supplier=Future+Electronics, ComponentLink13Description=http://datasheet.octopart.com/B72210S2271K101-EPCOS-datasheet-11546246.pdf?src-supplier=Verical, ComponentLink13URL=http://datasheet.octopart.com/B72210S2271K101-EPCOS-datasheet-11546246.pdf?src-supplier=Verical, ComponentLink14Description=http://datasheet.octopart.com/B72210S2271K101-EPCOS-datasheet-11546246.pdf?src-supplier=TME, ComponentLink14URL=http://datasheet.octopart.com/B72210S2271K101-EPCOS-datasheet-11546246.pdf?src-supplier=TME, ComponentLink15Description=http://datasheet.octopart.com/B72210S2271K101-EPCOS-datasheet-11546246.pdf?src-supplier=TTI, ComponentLink15URL=http://datasheet.octopart.com/B72210S2271K101-EPCOS-datasheet-11546246.pdf?src-supplier=TTI, ComponentLink16Description=http://datasheet.octopart.com/B72210S2271K101-EPCOS-datasheet-11546246.pdf?src-supplier=Rutronik, ComponentLink16URL=http://datasheet.octopart.com/B72210S2271K101-EPCOS-datasheet-11546246.pdf?src-supplier=Rutronik, Contact Plating=154ConductorMaterial, Current Rating=25A, Depth=5.4mm, Diameter=12mm, Energy=55J, ESD Protection=5898YesNo, Height=14.5mm, Item Type=Varistors, Lead Pitch=7.5mm, Lead/Base Style=Radial, Manufacturer Part Number=B72210S2271K101, Material=4240ConductorMaterial, Mounting Technology="Through Hole", Number of Circuits=1, Packaging=Bulk, Pricing="1=0.12365, 10=0.12192, 30=0.12018, 50=0.11845, 100=0.11671 (USD)", Radiation Hardening=5898YesNo, Reach SVHC Compliant=Unknown, RoHS=Yes, RoHS Compliant=Yes, Series=AdvanceD, Stock=5700, Supplier=Avnet, Termination=4745ConnectorType, Voltage Rating=350V, Voltage Rating (AC)=275V, Voltage Rating (DC)=350V, Voltage Tolerance=10%, Weight=2.000002g

## Free pads (board coordinates)
  round 393.7 hole 196.85: MH1(0,0) MH1(2.54,5592.68) MH1(4411.57,-2.54) MH1(4414.12,5590.13)

## Via types
v1: diameter 39.37, hole 19.68, Top Layer to Bottom Layer, tented both sides, 81 vias

## Nets (pads, with @x,y where several pads share a name; then routed paths per layer and width w, separated by ;. In a path a pad name is that pad's centre, name@x,y a point inside that pad or via, vN(x,y) a via of type N, cw(c..) or ccw(c..) an arc to the next point about the centre after c; other vN are vias at no path point)
24VDC: C24.2 C26.1 C27.1 C28.1 C29.1 C30.1 C31.1 C32.2 C38.2 C39.2 C41.2 C43.2 J1.1 J2.1 J3.1 J4.1 J6.1 R54.2 T3.3 T3.4 T3.5 T3.6 U4.4 U5.4 | length 2676.5
  Top Layer w50: C24.2@2555,4214.73 3169.73,4214.73 ccw(c3169.73,4220) 3175,4220 ; 3910,4610 ccw(c3913.16,4610) 3913.16,4606.84 v1(4523.58,4606.84)
  Bottom Layer w20: C24.2@2555,4214.73 2605.78,4214.73 ccw(c2605.78,4243.67) 2634.72,4243.67 R54.2@2634.72,4417.8 ; C41.2@3074.99,4605.09 C41.2@3075.99,4606.09 ; C41.2@3077.16,4612.93 3077.16,4666.98 3077.24,4667.06 3077.24,4719.65 U4.4@3077.32,4719.73 ; C43.2@4436.2,4614.67 4436.2,4668.73 4436.28,4668.81 4436.28,4721.4 U5.4@4436.36,4721.48
  Bottom Layer w50: C41.2@3074.99,4605.09 v1(3164.54,4605.09) ; T3.6@3272.81,4343.25 C26.1@3272.81,4505.09 ; T3.5@3469.66,4343.25 C27.1@3469.66,4505.09 ; T3.4@3666.51,4343.25 C38.2@3666.51,4505.09 ; T3.3@3863.36,4343.25 C39.2@3863.36,4505.09 C32.2@3989.45,4505.09 ; C43.2@4434.03,4606.84 v1(4523.58,4606.84)
AC_L: F1.1 J5.1
AC_N: C1.2 C6.2 J5.3 T1.1 VR1.2
BLK: C56.2 R46.1 R50.2 U6.4 | length 2805.7
  Top Layer w20: v1(3370,2150) 3370,2500 cw(c3415,2500) 3415,2545 v1(3525,2545)
  Bottom Layer w20: R46.1@2025,2890 R46.1@2040,2890 C56.2@2040,2995 R50.2@2111.5,2995 ; R50.2@2126.5,2995 2126.5,2773.5 ccw(c2170,2773.5) 2170,2730 2640,2730 cw(c2640,2670) 2700,2670 2700,2213.8 ccw(c2763.8,2213.8) 2763.8,2150 v1(3370,2150) ; v1(3525,2545) U6.4@3591.85,2545

## Text inside footprints (layer, text, board x,y; h text height)
D1: Top Overlay "+" at 1897.43,970.25 h52.3; Top Overlay "-" at 1281.43,958.82 h52.3
T1: Top Overlay "1" at 2817.74,602.31 h39.37
T2: Top Overlay "1" at 509.95,-105.89 h39.37
T3: Top Overlay "16" at 4229.45,2849.92 h39.37; Top Overlay "9" at 2865.99,2848.56 h39.37; Top Overlay "8" at 2863.93,4216.98 h39.37; Top Overlay "1" at 4251.09,4230.87 h39.37; Top Overlay "Board Cutout" at 3299.08,3772.28 h60